# EAGLE board ACS758 (EAGLE 9.6.2)
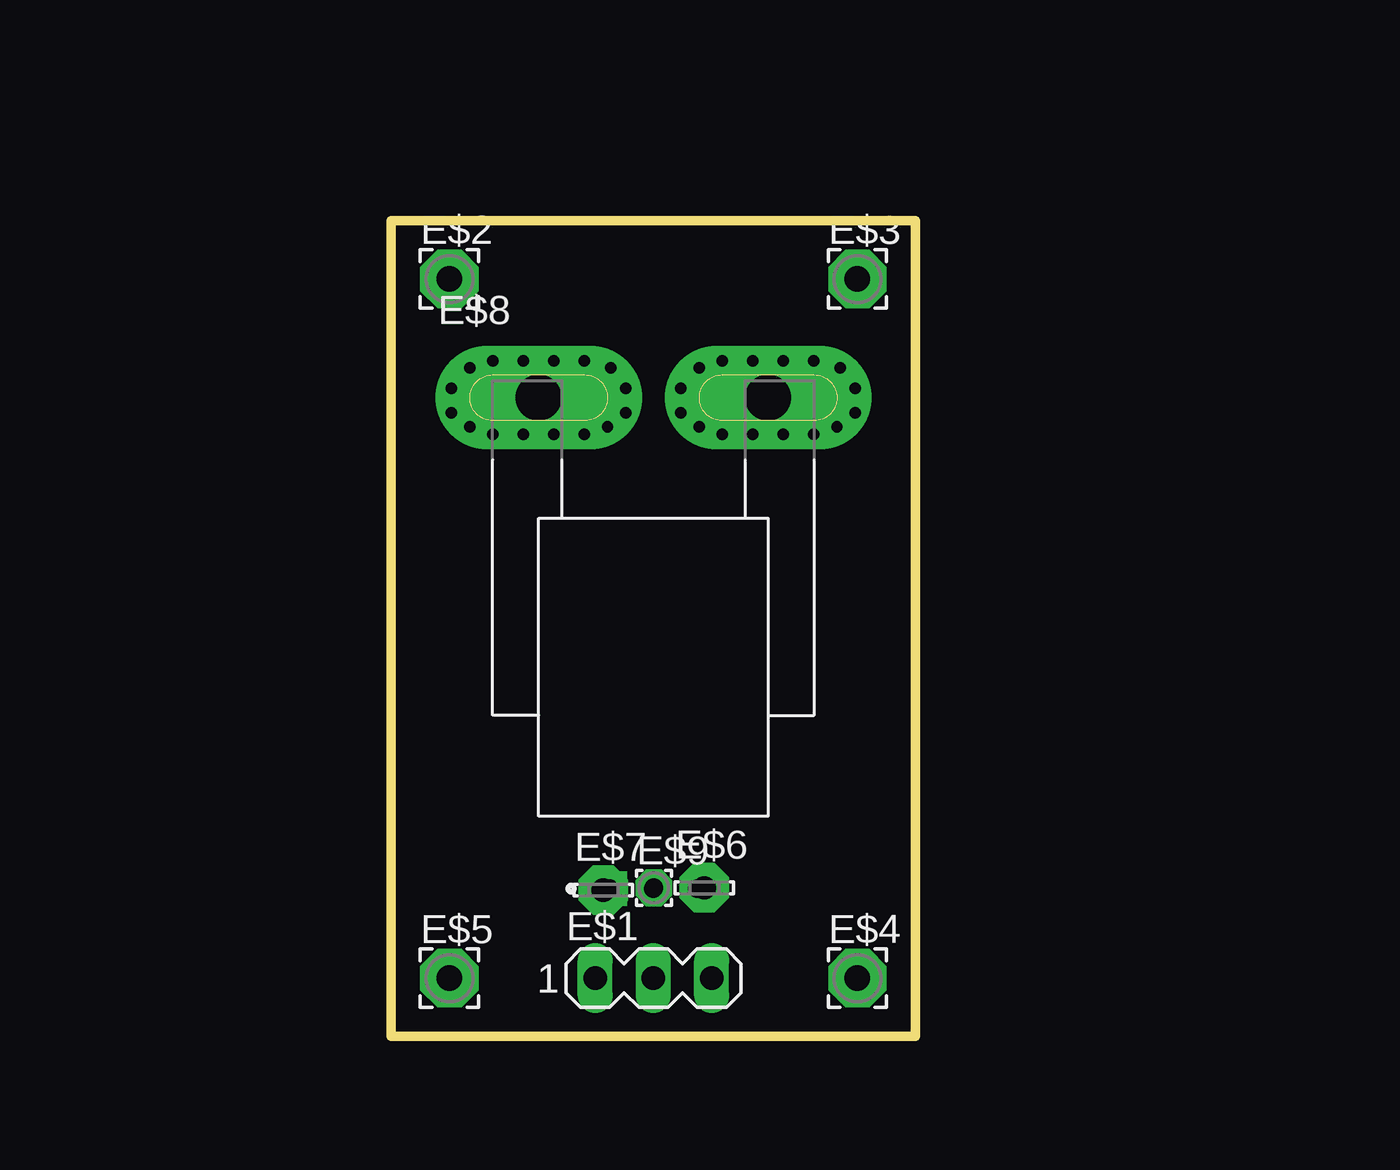
[diagram p0: board, top side]
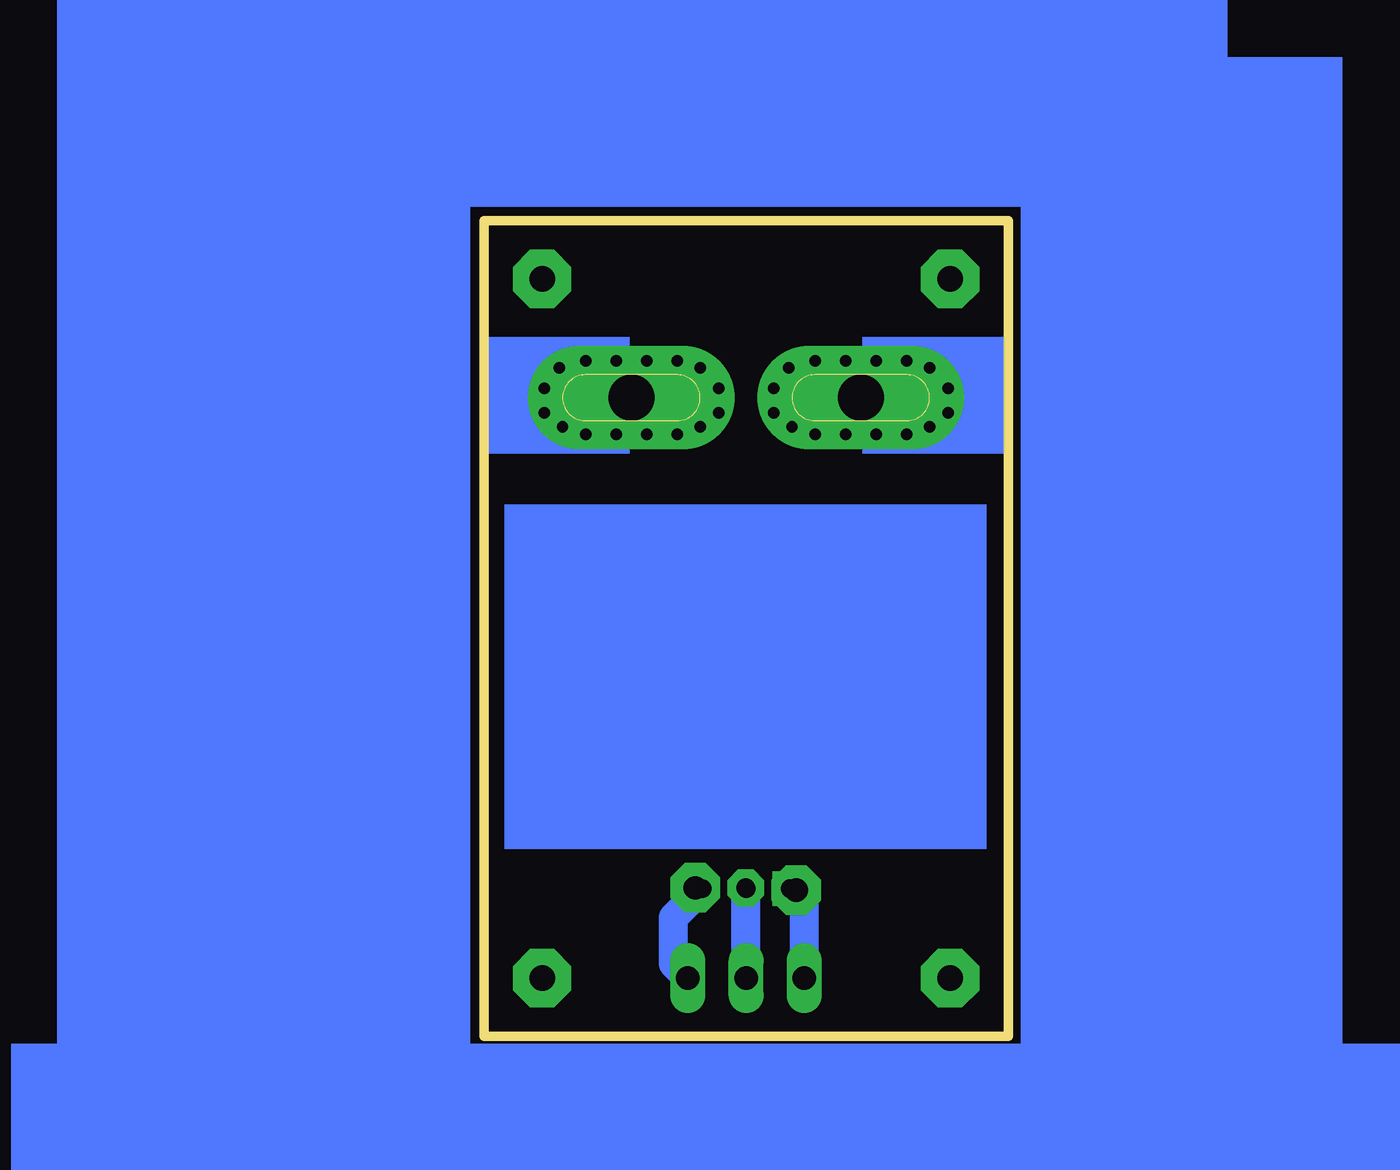
[diagram p1: board, bottom side, seen from below]

Size 22.86 x 35.56 mm. Coordinates in mm from the lower left corner, seen from the top.
Outline: 0,0 0,35.56 22.86,35.56 22.86,0 0,0
Copper layers (1*16): Top 0.035mm / dielectric 1.5mm / Bottom 0.035mm
Design rules "default": minimum track width 6mil, minimum drill 0.35mm, track to track 6mil, track to pad 6mil, pad to pad 6mil, via to via 6mil, smd to smd 6mil, copper to edge 40mil, drill to drill 6mil, minimum pad ring 10mil, minimum via ring 8mil, stop-mask expansion 4mil, vias tented up to drill 0mil, thermal gap 10mil

## Footprints (pad centres in the part's own frame; a part is rotated, then mirrored left to right if it is on the bottom)
MA03-1 = drill 1.016 long: 1 -2.54,0; 2 0,0; 3 2.54,0
2,54/1,1 = drill 1.118 pad 2.54 octagon: 1 0,0
LSP10 = drill 1.016 pad 2.159 octagon: MP 0,0
XDCR_ACS770KCB-150U-PFF-T = drill 0.8 pad 1.5 square: 1 -1.91,-10.7 | drill 0.8 pad 1.5: 2 0,-10.7; 3 1.91,-10.7 | drill 2 pad 4.5 long: 4 5,10.7; 5 -5,10.7 | drill 0.5 pad 0.8: 4_1 3,9.1; 4_2 4.33,9.1; 4_3 5.66,9.1; 4_4 6.99,9.1; 4_5 8,9.43; 4_6 8.8,10.05; 4_7 8.8,11.1; 4_8 8.15,12; 4_9 6.99,12.3; 4_10 5.66,12.3; 4_11 4.33,12.3; 4_12 3,12.3; 4_13 2,12; 4_14 1.2,11.1; 4_15 1.2,10.05; 4_16 2,9.43; 5_1 -7,9.1; 5_2 -5.67,9.1; 5_3 -4.34,9.1; 5_4 -3.01,9.1; 5_5 -8,9.43; 5_6 -8.8,10.05; 5_7 -8.8,11.1; 5_8 -8,12; 5_9 -7,12.3; 5_10 -5.67,12.3; 5_11 -4.34,12.3; 5_12 -3.01,12.3; 5_13 -1.85,12; 5_14 -1.2,11.1; 5_15 -1.2,10.05; 5_16 -2,9.43
1,6/0,8 = drill 0.813 pad 1.6 octagon: 1 0,0

## Placement (x,y rotation side)
E$1  [MA03-1]  11.43,2.54 0 top
E$2  [2,54/1,1]  2.54,33.02 0 top
E$3  [2,54/1,1]  20.32,33.02 0 top
E$4  [2,54/1,1]  20.32,2.54 0 top
E$5  [2,54/1,1]  2.54,2.54 0 top
E$6  [LSP10]  13.65,6.48 0 top
E$7  [LSP10]  9.25,6.38 0 top
E$8  ACS758LCB 50U  [XDCR_ACS770KCB-150U-PFF-T]  11.43,17.15 0 top
E$9  [1,6/0,8]  11.45,6.48 0 top

## Library data of the parts
E$1 = con-lstb
E$2-E$5 E$9 = wirepad
E$6 E$7 = solpad
E$8 = ACS758LCB-100B-PFF-T

## Nets
S$1: E$1.1 E$8.1
S$2: E$1.2 E$8.2
S$3: E$1.3 E$8.3

## Tracks (layer width: path | path; a pad name or v marks a point on that pad's centre or on a via)
S$1
  Bottom 1.27: E$1.1 8.89,5.82 E$8.1
S$2
  Bottom 1.27: E$1.2 E$8.2
S$3
  Bottom 1.27: E$1.3 14.61,3.18 14.61,5.18 E$8.3
(copper drawn outside any net)
  shapes: Bottom area x7